# Altium PCB electronic_dc_load_v2.PcbDoc (part 4 of 4)
Units mm, origin at the board's own origin, x right, y up, seen from the top; angles counter-clockwise.
Board outline 170 x 170 mm, 4 copper layers (Top Layer, Int1(GND), Int2, Bottom Layer(PWR)), stack 1.607 mm thick; 177 components, 118 nets, 502 pads, 141 vias.
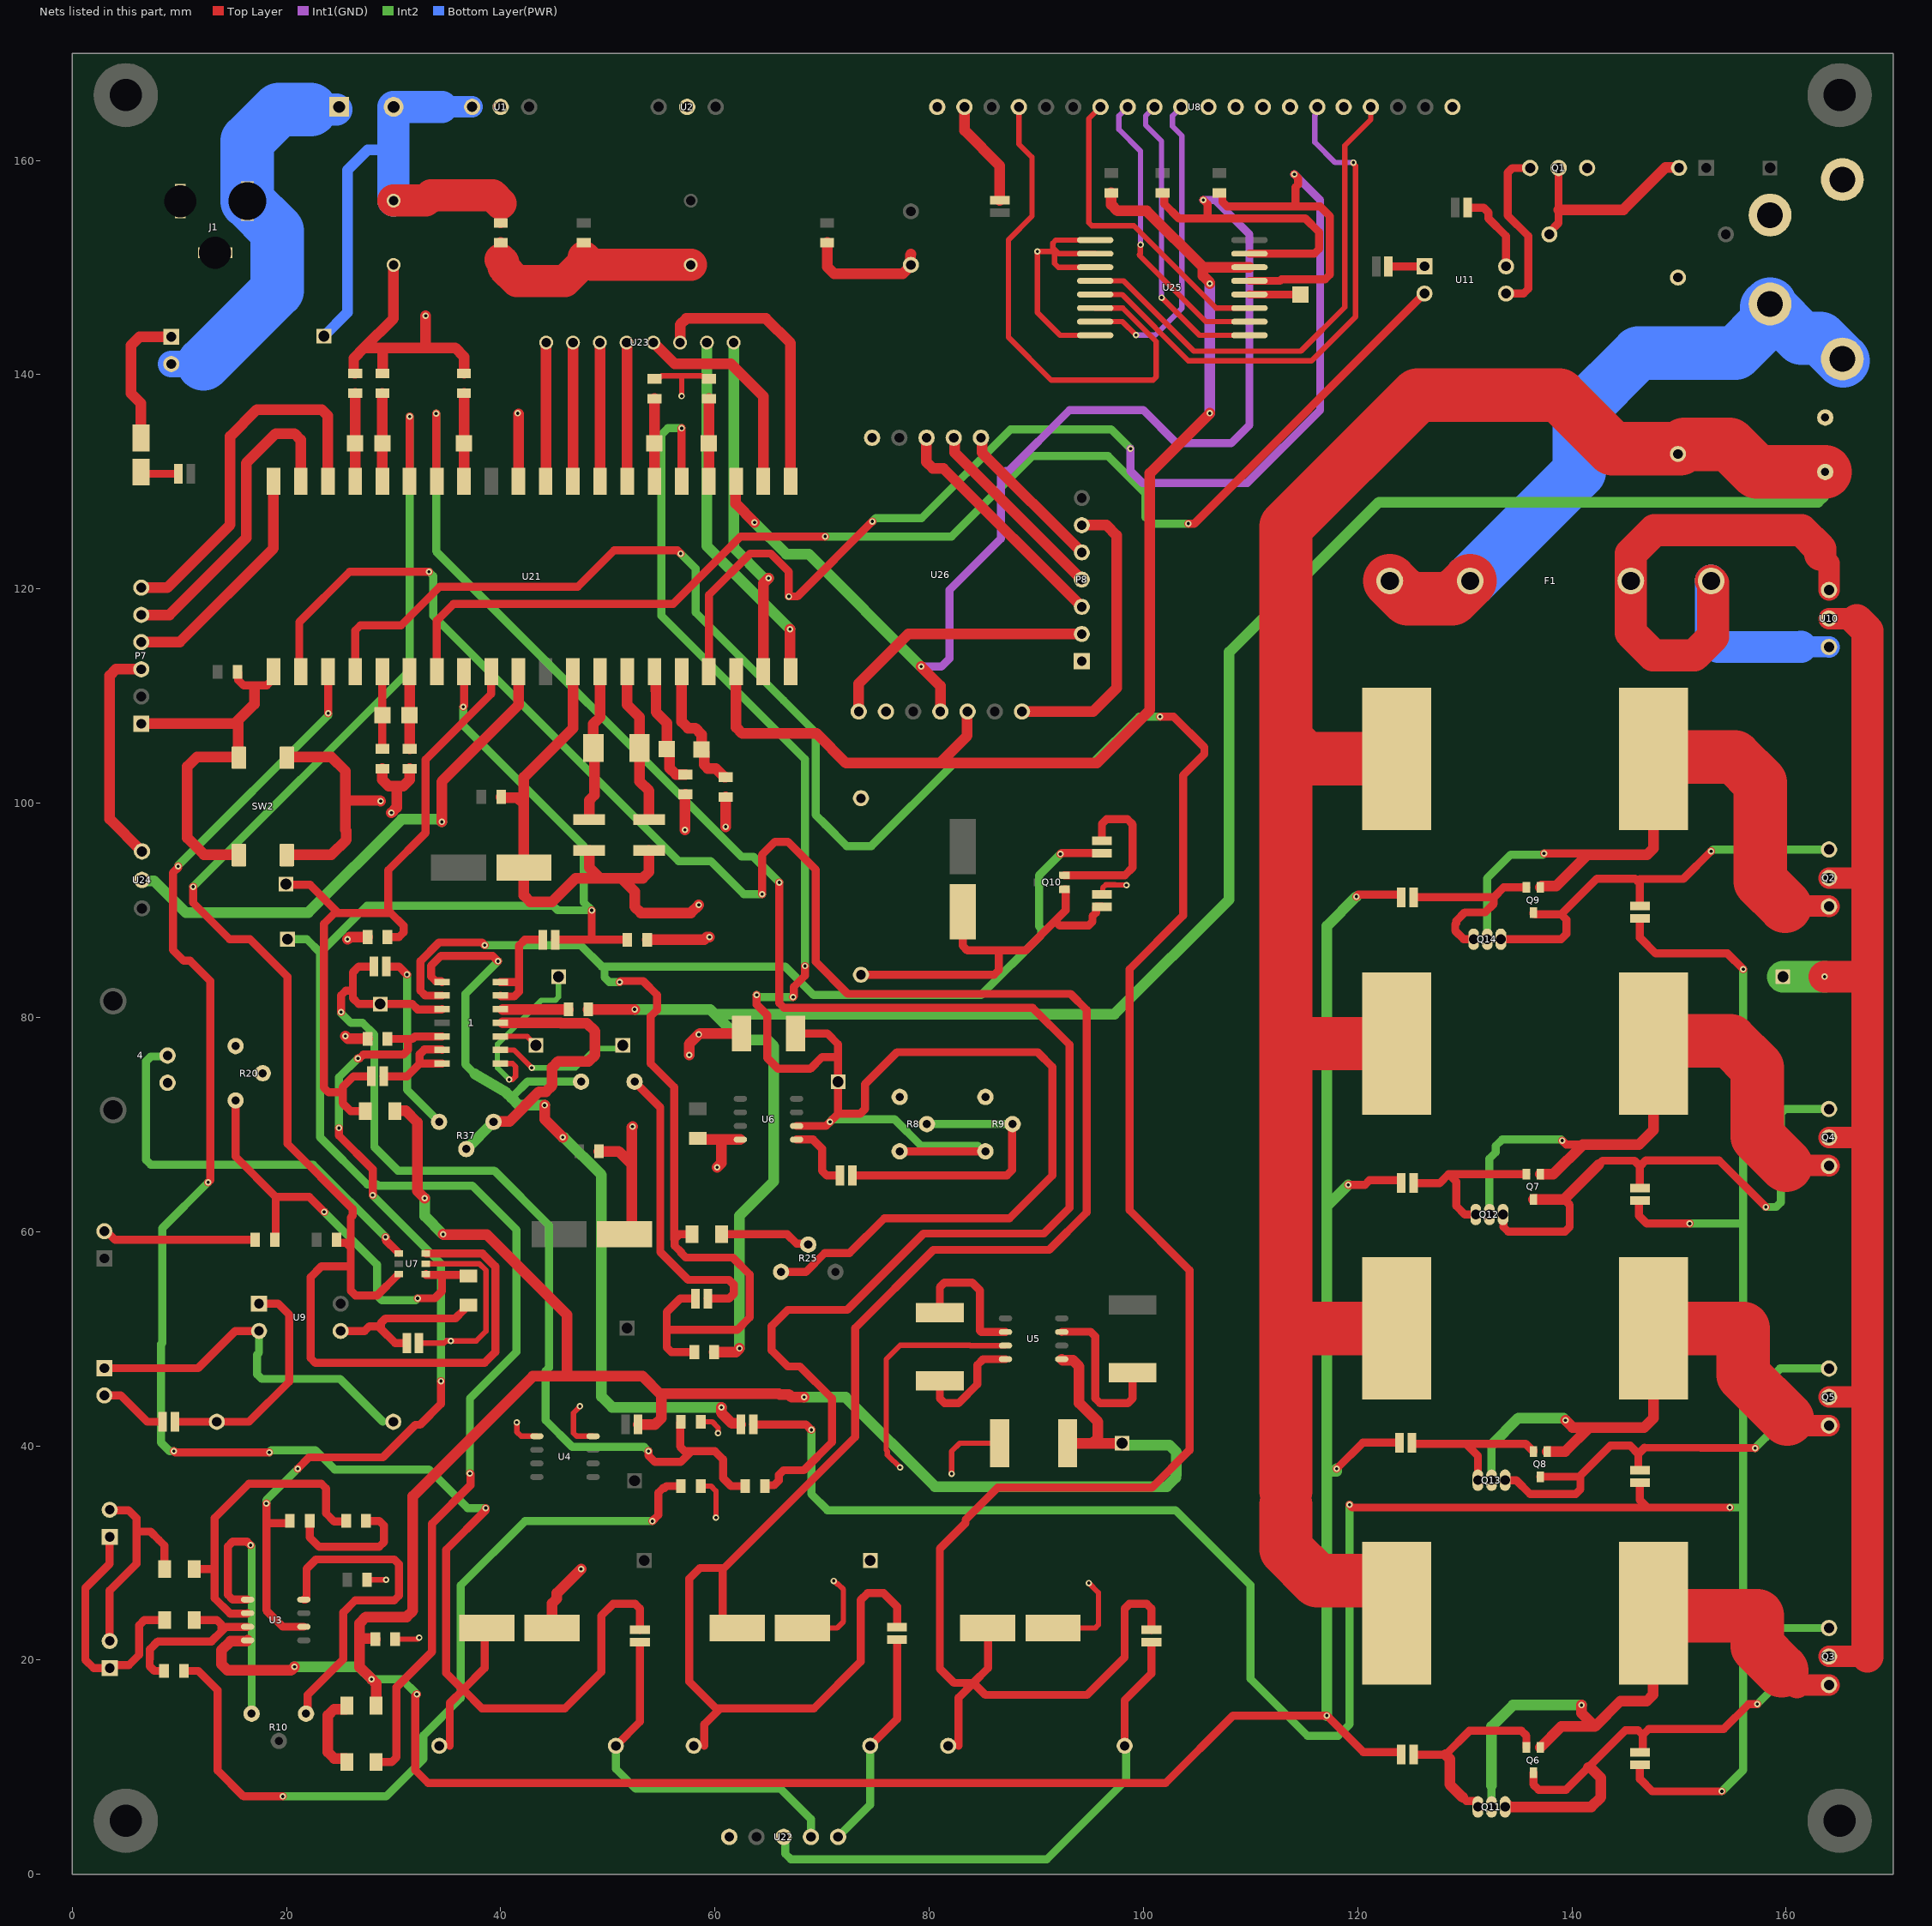
[diagram p4: the nets of this part, all layers, seen from the top]

## Via types
v1: diameter 0.6, hole 0.3, Top Layer to Bottom Layer(PWR), 141 vias

## Nets (pads, with @x,y where several pads share a name; then routed paths per layer and width w, separated by ;. In a path a pad name is that pad's centre, name@x,y a point inside that pad or via, vN(x,y) a via of type N, cw(c..) or ccw(c..) an arc to the next point about the centre after c; other vN are vias at no path point) (continued)
-5: C7.1 C14.2 J3.01 R4.2 R12.2 R43.1 R44.1 R45.1 R46.1 R49.2 U3.4 U5.5 | length 393.1
  Top Layer w0.75: v1(32.175,16.825) 32.025,16.675 32.025,9.725 33.225,8.525 102.075,8.525 108.375,14.825 v1(117.125,14.825) 120.524,11.426 R43.1@123.829,11.426 ; v1(118.05,37.875) 120.475,40.3 R45.1@123.925,40.3 ; v1(119.125,64.375) 120.675,64.375 121.1,64.8 123.812,64.8 R44.1@123.829,64.783 ; v1(119.875,91.275) 120.062,91.462 R46.1@123.829,91.462
  Top Layer w1: U3.4@16.375,21.845 16.305,21.775 14.775,21.775 13.925,20.925 13.925,19.636 14.511,19.05 20.425,19.05 v1(20.75,19.375) ; C7.1@28.3,21.95 28.25,22 26.825,22 ; R49.2@28.375,15.75 28.375,17.8 v1(27.95,18.225) 26.825,19.35 26.825,22 ; R4.2@30.125,71.25 30.175,71.3 31.125,71.3 32.225,70.2 32.225,63.8 v1(32.9,63.125) ; v1(34.625,59.75) 34.65,59.725 38.7,59.725 46.175,52.25 46.175,46.5 ; R12.2@52.825,42 54.414,42 55,42.586 55,44.75 ; v1(68.325,44.55) 67.15,44.55 66.9,44.8 66.05,44.8 65.975,44.875 55.125,44.875 55,44.75 ; U5.5@92.375,48.095 92.47,48 93.414,48 94,47.414 94,44 95.75,42.25 95.75,40.75 95.25,40.25 ; C14.2@92.925,40.25 95.25,40.25 ; J3.01@98,40.25 95.25,40.25 ; 26.825,22 26.825,23.439 27.411,24.025 31.214,24.025 31.8,24.611 31.8,35.3 43,46.5 46.175,46.5 ; 46.175,46.5 53.25,46.5 55,44.75
  Int2 w0.75: v1(27.95,18.225) 30.775,18.225 v1(32.175,16.825)
  Int2 w1: v1(20.75,19.375) 26.8,19.375 v1(27.95,18.225) ; v1(32.9,63.125) 32.925,63.1 32.925,61.45 v1(34.625,59.75) ; v1(68.325,44.55) 72.2,44.55 80.55,36.2 102.185,36.2 103.025,37.04 103.025,37.275 103.075,37.325 103.075,39.425 102.435,40.065 98.185,40.065 J3.01@98,40.25 ; v1(117.125,14.825) 117.125,37.625 ; v1(118.05,37.875) 118.05,37.625 117.125,37.625 ; v1(119.125,64.375) 117.125,62.375 ; v1(119.875,91.275) 117.125,88.525 117.125,62.375 ; 117.125,37.625 117.125,62.375
B1: Q3.3 Q6.1 Q11.2 R38.2 | length 62.2
  Top Layer w1: Q6.1@137.054,11.843 139.011,13.8 142.15,13.8 ; v1(140.9,15.8) 140.9,15.05 142.15,13.8 ; R38.2@149.277,26.05 R38.2@147.611,24.384 147.575,24.348 147.575,16.761 146.989,16.175 144.525,16.175 142.15,13.8
  Top Layer w2: 161.02,17.68 Q3.3@164,17.68
  Top Layer w2.5: 159.7,19 161.02,17.68
  Top Layer w5: R38.2@147.845,24.15 157.3,24.15 157.3,21.3 159.6,19
  Int2 w0.75: Q11.2@132.5,6.3 132.5,8.3
  Int2 w1: 132.5,8.3 132.5,13.8 134.5,15.8 v1(140.9,15.8)
B2: Q4.3 Q7.1 Q12.2 R39.2 | length 60.3
  Top Layer w0.75: v1(139.1,68.5) 139.475,68.125 141.025,68.125
  Top Layer w1: Q7.1@137.054,65.372 138.272,65.372 141.025,68.125 146.25,68.125 147.611,69.486 R39.2@147.611,77.555
  Top Layer w2: 160,66.2 163.93,66.2 Q4.3@164,66.13
  Top Layer w5: R39.2@147.856,77.8 154.8,77.8 157.3,75.3 157.3,68.9 160,66.2
  Int2 w0.75: Q12.2@132.3,61.6 132.3,66.8 132.9,67.4 132.9,68 133.5,68.6 139,68.6 v1(139.1,68.5)
B3: Q5.3 Q8.1 Q13.2 R40.2 | length 56.1
  Top Layer w1: Q8.1@137.704,39.475 139.375,39.475 141.625,41.725 ; v1(139.4,42.4) 140.075,41.725 141.625,41.725 ; R40.2@147.611,50.969 147.611,42.586 146.75,41.725 141.625,41.725 ; 160.1,42.5 160.695,41.905
  Top Layer w2: 160.695,41.905 Q5.3@164,41.905
  Top Layer w5: R40.2@147.611,50.969 155.969,50.969 155.969,46.631 160.1,42.5
  Int2 w0.75: Q13.2@132.5,36.799 132.5,40.1
  Int2 w1: 132.5,40.1 135,42.6 139.2,42.6 v1(139.4,42.4)
B4: Q2.3 Q9.1 Q14.2 R41.2 | length 63.9
  Top Layer w0.75: v1(137.4,95.3) 141.362,95.3 141.462,95.2
  Top Layer w1: Q9.1@137.054,92.137 137.175,92.258 138.521,92.258 141.462,95.2 147.025,95.2 147.611,95.786 R41.2@147.611,104.14
  Top Layer w2: 159.9,90.4 163.955,90.4 Q2.3@164,90.355
  Top Layer w5: R41.2@147.771,104.3 155.2,104.3 157.6,101.9 157.6,92.7 159.9,90.4
  Int2 w0.75: Q14.2@132.1,87.3 132.1,93 134.3,95.2 137.3,95.2 v1(137.4,95.3)
DB4: U8.11 U25.7 | length 29.2
  Top Layer w0.5: U25.7@95.5,144.95 98.05,144.95 v1(99.3,143.7)
  Int1(GND) w0.5: v1(99.3,143.7) 101.1,143.7 103.6,146.2 103.6,162.3 102.705,163.195 102.705,164.167 U8.11@103.533,164.995
DB5: U8.12 U25.9 | length 28.4
  Top Layer w0.5: v1(101.7,147.2) 105.22,143.68 U25.9@109.9,143.68
  Int1(GND) w0.5: U8.12@101.033,164.995 100.205,164.167 100.205,163.295 101.7,161.8 v1(101.7,147.2)
DB6: U8.13 U25.10 | length 27.9
  Top Layer w0.5: v1(99.731,152.131) 99.712,152.112 99.712,151.312 99.6,151.2 105.85,144.95 U25.10@109.9,144.95
  Int1(GND) w0.5: U8.13@98.533,164.995 97.705,164.167 97.705,162.895 99.731,160.869 v1(99.731,152.131)
DB7: U8.14 U25.11 | length 29.6
  Top Layer w0.5: U8.14@95.993,164.995 94.9,163.902 94.9,154.193 95.193,153.9 99.1,153.9 106.78,146.22 U25.11@109.9,146.22
E: U8.6 U25.5 | length 50.8
  Top Layer w0.5: U25.5@95.5,147.49 98.01,147.49 104.2,141.3 115.7,141.3 119.8,145.4 119.8,159.5 119.623,159.677 119.623,159.781 v1(119.604,159.8)
  Int1(GND) w0.5: U8.6@116.233,164.995 116.037,164.799 116.037,164.227 116,164.19 116,161.7 117.9,159.8 v1(119.604,159.8)
GND: 1.11 4.2 B3.1 B4.1 C1.2 C2.2 C3.2 C4.2 C5.2 C6.2 C7.2 C8.2 C9.2 C10.2 C11.2 C12.2 C13.2 C14.1 C17.2 C18.2 C19.2 C20.2 C21.1 C22.1 C23.2 C24.2 C26.2 D1.2 D7.K D8.A J1.2 J1.3 J13.01 P1.1 P7.3 P8.1 Q1.3 R7.1 R8.3 R9.3 R15.1 R19.1 R20.2 R20.3 R37.2 R37.3 R52.2 R53.2 R54.2 R55.2 R56.2 R57.2 R58.2 R59.2 R60.2 R61.1 R65.1 SW2.3 SW2.4 U1.2 U2.2 U4.1 U4.8 U5.3 U6.4 U7.2 U8.1 U8.5 U8.7 U8.8 U8.9 U8.10 U8.20 U21.12 U21.31 U22.5 U24.3 U25.1 U25.2 U25.3 U25.8 U26.2 U26.12 | length 383.2
  Top Layer w0.5: C11.2@27.525,27.5 v1(29.3,27.5) ; C7.2@30.15,21.95 32.25,21.95 v1(32.4,22.1) ; R19.1@32.375,49.6 34.7,49.6 34.9,49.8 v1(35.354,49.8) 37.721,49.8 38.621,50.7 38.621,56.386 38.007,57 U7.2@33.025,57 ; v1(41.5,42.2) 41.519,42.181 41.519,41.291 41.905,40.905 U4.1@43.375,40.905 ; v1(47.4,43.7) 47.4,43.673 46.8,43.073 46.8,41.198 47.093,40.905 U4.8@48.625,40.905 ; R55.2@54.356,139.609 54.556,139.809 54.958,139.809 55.049,139.9 56.9,139.9 ; v1(56.9,138) 56.9,139.9 ; R15.1@58.675,36.25 59.65,36.25 60.1,35.8 v1(60.1,33.3) ; C19.2@58.675,42.25 59.75,42.25 60.3,41.7 v1(60.3,41.2) ; R56.2@59.436,139.609 59.236,139.809 58.834,139.809 58.743,139.9 56.9,139.9 ; C20.2@68.18,23 71.4,23 72,23.6 72,26.6 71.5,27.1 71.427,27.1 71.127,27.4 v1(71.1,27.4) ; v1(77.28,37.98) 76.1,39.159 76.1,39.5 76,39.6 76,48.1 77.3,49.4 83.8,49.4 83.835,49.365 U5.3@87.125,49.365 ; v1(82.1,37.4) 82.1,39.5 82.85,40.25 C14.1@86.575,40.25 ; C24.2@91.56,23 95.5,23 95.8,23.3 95.8,26.3 v1(94.9,27.2) ; U25.8@95.5,143.68 92.22,143.68 90.1,145.8 v1(90.1,151.5) 91.537,151.5 91.7,151.663 ; U25.3@95.5,150.03 92.063,150.03 91.7,150.393 91.7,151.663 ; U25.2@95.5,151.3 92.1,151.3 91.9,151.5 91.719,151.681 ; U25.1@95.5,152.57 91.83,152.57 91.537,152.277 91.537,151.863 91.719,151.681 ; R65.1@96.13,91.485 96.2,91.555 96.2,92.088 96.493,92.381 97.344,92.381 97.363,92.362 98.39,92.362 v1(98.409,92.343) ; 91.7,151.663 91.719,151.681
  Top Layer w1: D1.2@6.425,134.1 6.425,137.325 5.5,138.25 5.5,142.75 6.29,143.54 P1.1@9.25,143.54 ; P7.3@6.451,112.5 4.086,112.5 3.5,111.914 3.5,98.513 U24.3@6.513,95.5 ; SW2.3@19.99,95.2 24.2,95.2 25.586,96.586 25.586,97.414 25.5,97.5 25.5,100.25 ; SW2.4@19.99,104.3 24.2,104.3 25.5,103 25.5,100.25 ; v1(25.5,78.25) 25.75,78 R7.1@27.575,78 ; v1(25.707,87.293) 25.914,87.5 C8.2@27.575,87.5 ; R54.2@26.416,140.117 26.331,140.117 26.281,140.167 26.281,141.531 27.25,142.5 ; v1(28.8,100.2) 28.75,100.25 25.5,100.25 ; R60.2@28.956,103.215 28.956,102.186 29.542,101.6 30.3,101.6 ; R53.2@29,140.161 29,142.5 ; v1(29.8,99.1) 30.3,99.6 30.3,101.6 ; C2.2@30,150.25 30,145.25 27.25,142.5 ; R59.2@31.496,103.215 31.5,103.211 31.5,102.186 30.914,101.6 30.3,101.6 ; v1(33,145.5) 33,142.5 ; R52.2@36.576,140.117 36.576,141.674 35.75,142.5 33,142.5 ; R37.3@39.33,70.25 39.369,70.289 40.816,70.289 43.581,73.054 44.214,73.054 44.8,73.64 44.8,75.314 45.386,75.9 48.214,75.9 48.8,76.486 48.8,78.7 48.027,79.473 45.615,79.473 45.592,79.496 1.11@40.2,79.496 ; 40,150.75 C3.2@40,152.325 ; C17.2@40.041,100.584 40.041,100.55 40.091,100.5 41.58,100.5 42.166,99.914 ; U21.31@41.656,130.048 v1@41.656,136.344 ; C23.2@44.8,23 44.8,25.3 45.25,25.75 45.25,26.25 v1(47.5,28.5) ; U21.12@46.736,112.268 46.736,106.986 42.166,102.416 42.166,99.914 ; C22.1@48.26,95.603 48.26,93.99 49.25,93 ; C9.2@49.175,67.5 51,67.5 52.25,66.25 ; C10.2@51.55,59.75 52.25,60.45 52.25,66.25 ; v1(52.3,69.8) 52.25,69.75 52.25,66.25 ; C26.2@53.675,87.25 59,87.25 59.25,87.5 v1(59.5,87.5) ; C21.1@53.848,95.603 53.848,93.586 53.262,93 51.25,93 ; v1(57.2,97.5) 57.2,100.775 R58.2@57.25,100.825 ; v1(57.6,76.5) 57.6,77.5 58.6,78.5 C13.2@62.475,78.5 ; v1(58.5,90.5) 57.75,89.75 53.086,89.75 52.5,90.336 52.5,91.75 51.25,93 ; C12.2@58.75,68.625 58.765,68.61 60.6,68.61 ; v1(60.2,66) 60.6,66.4 60.6,68.61 ; v1(61,97.8) R57.2@61,100.575 ; U6.4@62.375,68.595 62.36,68.61 60.6,68.61 ; C5.2@70.48,152.325 70.48,150.07 71.125,149.425 77.55,149.425 78.25,150.125 78.25,151.2 78.3,151.25 ; 27.25,142.5 29,142.5 ; 29,142.5 33,142.5 ; 42.166,99.914 C18.2@42.166,93.98 42.166,91.386 42.752,90.8 44.8,90.8 47,93 49.25,93 ; 49.25,93 51.25,93
  Top Layer w3: 40,150.75 40.25,150.5 40.25,150.007 41.507,148.75 45.993,148.75 47.75,150.507 47.75,151 48.5,150.25 C6.2@57.75,150.25
  Int1(GND) w0.5: 34.9,49.8 v1(35.354,49.8)
  Int2 w1: R37.2@36.79,67.71 R37.3@39.33,70.25
  other v1: 58.5,78.4 41.6,136.4
Net1_1: 1.1 C16.2 R28.1 | length 79.4
  Top Layer w0.75: 1.1@34.525,83.31 34.45,83.385 33.943,83.385 33.504,83.824 33.504,84.834 34.42,85.75 37,85.75 37.004,85.746 39.254,85.746 v1(39.75,85.25)
  Top Layer w1: v1(44.1,71.8) 44.1,70.5 v1(45.8,68.8) ; v1(60.6,43.6) 60.6,43.1 61.6,42.1 62.325,42.1 R28.1@62.425,42
  Int2 w0.75: 37.581,74.719 36.7,75.6 36.7,82.2 v1(39.75,85.25) ; 41.2,72.7 42.5,74 C16.2@47.5,74
  Int2 w1: 37.581,74.719 40.477,73.02 40.568,72.929 40.999,72.499 41.697,71.8 v1(44.1,71.8) ; v1(45.8,68.8) 45.9,68.8 49.4,65.3 49.4,44.6 50.4,43.6 v1(60.6,43.6)
Net1_2: 1.2 R23.1 R26.2 R27.1 R66.1 | length 143.1
  Top Layer w0.75: 1.2@34.525,82.04 32.96,82.04 32.5,82.5 32.5,85.25 34.25,87 38.25,87 v1(38.5,86.75) ; v1(51.1,83.3) 51.2,83.4 53.3,83.4 54.6,82.1 54.6,80.7 54,80.1 54,75.7 56.2,73.5 56.2,59.3 ; R26.2@57.875,59.75 56.689,59.75 56.25,59.311 56.25,59.25 56.25,58.689 56.835,58.104 56.835,58.024 57.274,57.585 61.665,57.585 63.25,56 63.25,52 62.095,50.845 55.5,50.845 ; R23.1@58.075,48.75 55.939,48.75 55.5,49.189 55.5,50.845 ; R27.1@58.175,53.75 56.75,53.75 55.5,52.5 55.5,50.845 ; v1(92.25,95.25) 92.335,95.335 R66.1@96.13,95.335
  Int2 w0.75: v1(38.5,86.75) 47.45,86.75 49.45,84.75 49.8,84.75 ; v1(51.1,83.3) 50.139,83.3 49.7,83.739 49.7,84.65 49.8,84.75 ; v1(92.25,95.25) 90.25,93.25 90.25,88.5 90.439,88.311 90.439,87.689 84.85,82.1 69.2,82.1 66.55,84.75 49.8,84.75
Net1_3: 1.3 C19.1 J5.01 R29.2 R35.2 | length 95
  Top Layer w0.75: v1(25.1,80.5) 25.1,82.061 25.539,82.5 26,82.5 ; R35.2@28.175,84.75 26.75,84.75 26.2,84.2 26.2,81.8 26.75,81.25 J5.01@28.75,81.25 31.75,81.25 32.25,80.75 34.505,80.75 1.3@34.525,80.77 ; v1(53.8,39.5) 53.8,39.1 54.4,38.5 56.8,38.5 57.8,39.5 ; C19.1@56.825,42.25 56.75,42.175 56.75,39.939 57.189,39.5 57.8,39.5 ; R29.2@62.825,36.25 61.5,36.25 60.75,37 60.75,38.75 60,39.5 57.8,39.5
  Int2 w0.75: v1(25.1,80.5) 25.1,80.4 26.011,79.489 27.111,79.489 28.2,78.4 28.2,67.9 30.4,65.7 39.4,65.7 44.5,60.6 44.5,47.3 44.2,47 44.2,42.4 46.7,39.9 53.4,39.9 v1(53.8,39.5)
Net1_5: 1.5 R1.1 R7.2 U3.6 | length 85
  Top Layer w0.75: v1(18.125,34.625) 18.125,32.775 ; R1.1@20.325,33 20.325,32.85 20.25,32.775 18.125,32.775 ; v1(21.05,37.875) 22.1,38.925 29,38.925 32.05,41.975 32.475,41.975 34.425,43.925 v1(34.425,46.05) ; U3.6@21.625,23.115 19.66,23.115 18.125,24.65 18.125,32.775 ; v1(24.904,69.675) 24.904,68.971 28.05,65.825 v1(28.05,63.4) ; v1(26.675,76.175) 26.825,76.175 27.175,76.525 30.911,76.525 31.35,76.964 31.35,78 ; R7.2@29.425,78 31.35,78 ; 1.5@34.525,78.23 31.99,78.23 31.76,78 31.35,78
  Int2 w0.75: v1(18.125,34.625) 18.125,34.95 v1(21.05,37.875) ; v1(24.904,69.675) 24.904,74.404 v1(26.675,76.175) ; v1(28.05,63.4) 34.425,57.025 v1(34.425,46.05)
Net1_6: 1.6 1.7 R6.2 | length 9.1
  Top Layer w0.75: R6.2@29.075,74.5 31.25,74.5 32.44,75.69 ; 1.7@34.525,75.69 32.44,75.69 ; 1.6@34.525,76.96 34.485,77 32.879,77 32.44,76.561 32.44,75.69
Net1_8: 1.8 J9.01 | length 16.4
  Top Layer w0.5: 1.8@39.975,75.69 41.107,75.69 41.4,75.397 41.4,74.5 41.1,74.2 v1(40.8,74.2)
  Int2 w0.5: v1(40.8,74.2) 39.7,75.3 39.7,77.5 43.8,81.6 45.107,81.6 45.4,81.893 J9.01@45.4,83.8
Net1_9: 1.9 J11.01 | length 13
  Top Layer w0.5: 1.9@39.975,76.96 41.24,76.96 v1(42.9,75.3)
  Int2 w0.5: v1(42.9,75.3) 47,75.3 48.8,77.1 51.1,77.1 J11.01@51.4,77.4
Net1_10: 1.10 J7.01 | length 3.7
  Top Layer w0.5: 1.10@39.975,78.23 42.47,78.23 J7.01@43.3,77.4
Net1_12: 1.12 R50.1 | length 6.1
  Top Layer w1: 1.12@40.2,80.75 R50.1@46.325,80.75
Net1_13: 1.13 1.14 R51.1 | length 10.5
  Top Layer w0.75: 1.13@39.975,82.04 40.05,81.965 40.641,81.965 40.649,81.957 41.27,81.957 41.709,82.397 41.709,83.101 ; 1.14@39.975,83.31 41.5,83.31 41.709,83.101 ; R51.1@43.925,87.25 42.25,87.25 41.709,86.709 41.709,83.101
Net4_1: 4.1 U7.4 | length 38.7
  Top Layer w0.75: v1(29.25,59.5) 29.25,59.229 30.375,58.104 30.375,58.1 U7.4@30.45,58.025
  Int2 w0.75: 4.1@8.9,76.44 8.815,76.355 7.339,76.355 6.9,75.915 6.9,66.689 7.339,66.25 22.5,66.25 v1(29.25,59.5)
NetB1_1: B1.1 B2.1 F1.3 F1.4 | length 60.4
  Top Layer w5: F1.3@123,120.75 124.679,119.071 128.821,119.071 F1.4@130.5,120.75
  Bottom Layer(PWR) w5: F1.4@130.5,120.75 140.7,130.95 140.7,136.5 146.2,142 155.271,142 158.2,144.929 B1.1@158.2,146.3 ; B1.1@158.5,146.6 158.5,146.329 161.429,143.4 163.2,143.4 B2.1@165.3,141.3
NetC2_1: C2.1 C3.1 J10.01 SW1.2 U1.1 | length 49.9
  Top Layer w1: C3.1@40,154.175 40,156
  Top Layer w3: C2.1@30,156.25 33,156.25 33.5,156.75 39.25,156.75 40,156
  Bottom Layer(PWR) w1: J10.01@23.5,143.6 25.7,145.8 25.7,159.1 27.6,161 30,161
  Bottom Layer(PWR) w2: 34.5,165 U1.1@37.34,165
  Bottom Layer(PWR) w3: C2.1@30,156.25 30,161 SW1.2@30,165 34.5,165
NetC8_1: C8.1 J12.01 R4.1 R6.1 U21.9 | length 67.9
  Top Layer w0.75: J12.01@20.333,92.434 20.271,92.434 J12.01@19.961,92.442 20.011,92.392 22.208,92.392 24.85,89.75 ; R4.1@27.375,71.25 26,71.25 25.25,72 25.25,73 ; R6.1@27.925,74.5 26.25,74.5 25.25,73.5 25.25,73 ; C8.1@29.425,87.5 30.5,87.5 30.939,87.939 30.939,88.561 29.75,89.75 ; U21.9@39.116,112.268 39.116,110.196 33,104.08 33,97.25 29.5,93.75 29.5,90 29.75,89.75 ; 25.25,73 23.939,73 23.5,73.439 23.5,88.75 24.5,89.75 29.75,89.75
NetC13_1: C13.1 J2.01 R8.1 R9.1 R25.3 U6.6 U21.25 | length 185.4
  Top Layer w0.75: U21.25@56.896,130.048 56.896,134.996 v1(56.9,135) ; v1(63.9,82.1) 63.9,81.2 64.9,80.2 64.9,76.2 65.9,75.2 68.9,75.2 70,76.3 71.5,76.3 ; R25.3@66.17,56.25 68.5,56.25 70.25,58 72.561,58 75.811,61.25 87.5,61.25 91.5,65.25 91.5,75.379 90.129,76.75 77,76.75 74,73.75 74,71.439 73.561,71 71.5,71 ; v1(67.3,81.904) 67.361,81.965 67.361,82.861 68.4,83.9 v1(68.4,84.8) ; C13.1@67.525,78.5 70.5,78.5 71.5,77.5 71.5,76.3 ; U6.6@67.625,69.865 70.365,69.865 v1(70.75,70.25) 71.5,71 ; R8.1@77.25,67.5 R9.1@85.25,67.5 ; 71.5,71 J2.01@71.5,74 71.5,76.3
  Int2 w0.75: v1(56.9,135) 55.6,135 55,134.4 55,117.5 68.4,104.1 v1(68.4,84.8) ; v1(63.9,82.1) 64.096,81.904 v1(67.3,81.904) ; v1(70.75,70.25) 71,70.5 76.75,70.5 79.25,68 84.541,68 85.041,67.5 R9.1@85.25,67.5
NetC15_1: C15.1 R17.1 R20.1 U7.1 | length 41.8
  Top Layer w0.75: R20.1@15.25,72.25 15.25,67 19,63.25 ; R17.1@18.925,59.25 19,59.325 19,63.25 ; v1(23.525,61.85) 22.125,63.25 19,63.25 ; v1(32.25,53.775) 33.85,53.775 34.525,54.45 34.525,55.9 34.45,55.975 ; U7.1@33.025,56.05 33.025,56 33.05,55.975 34.45,55.975 ; C15.1@37,55.875 36.9,55.975 34.45,55.975
  Int2 w0.75: v1(23.525,61.85) 28.45,56.925 28.45,54.039 28.889,53.6 32.075,53.6 v1(32.25,53.775)
NetC15_2: C15.2 R19.2 U9.3 | length 16.5
  Top Layer w0.75: U9.3@25.06,50.73 27.311,50.73 27.75,51.169 28.581,51.169 28.811,50.939 ; R19.2@31.225,49.6 31.214,49.611 30.139,49.611 28.811,50.939 ; C15.2@37,53.125 36.775,53.125 36.55,52.9 36.55,52.675 35.775,51.9 29.25,51.9 28.811,51.461 28.811,50.939
NetC16_1: C16.1 R27.2 | length 28.5
  Top Layer w0.75: C16.1@52.5,74 54.9,71.6 54.9,58.1 57.5,55.5 61.311,55.5 61.75,55.061 61.75,54.189 61.311,53.75 R27.2@59.325,53.75
NetC20_1: C20.1 D4.K R34.2 U21.2 | length 236.6
  Top Layer w0.75: U21.2@21.336,112.268 21.2,112.404 21.2,116.9 25.9,121.6 v1(33.3,121.6) ; 59,12 59,14 60.3,15.3 60.5,15.5 ; C20.1@60.73,23 60.73,28.469 ; v1(64.4,91.5) 64.4,95.2 65.6,96.4 66.8,96.4 69.404,93.796 69.404,85.196 72.4,82.2 93.2,82.2 94.7,80.7 94.7,61.8 91.2,58.3 80.4,58.3 73.1,51 73.1,40.839 60.73,28.469 ; R34.2@77,23.075 77,25 75.75,26.25 74.25,26.25 73.6,25.6 73.6,19.85 69.25,15.5 60.5,15.5 ; 60.5,15.5 60.1,15.5 57.6,18 57.6,27.6 58.6,28.6 60.599,28.6 60.73,28.469
  Int2 w0.75: v1(33.3,121.6) 33.7,121.2 33.7,117.5 56.6,94.6 59.6,94.6 62.7,91.5 v1(64.4,91.5)
NetC21_2: C21.2 U21.14 Y1.2 | length 14.7
  Top Layer w1: U21.14@51.816,112.268 51.816,109.184 52.95,108.05 Y1.2@52.95,105.156 52.95,102.05 53.848,101.152 C21.2@53.848,98.453
NetC22_2: C22.2 U21.13 Y1.1 | length 14.3
  Top Layer w1: C22.2@48.26,98.453 48.26,100.26 48.75,100.75 48.75,105.056 Y1.1@48.65,105.156 48.65,107.4 49.276,108.026 U21.13@49.276,112.268
NetC23_1: C23.1 D5.K R42.2 U21.3 | length 172.8
  Top Layer w0.75: v1(9.5,39.5) 9.6,39.4 v1(18.4,39.4) ; v1(9.9,94.1) 9.9,94 9.4,93.5 9.4,86.3 10.4,85.3 11,85.3 12.9,83.4 12.9,64.8 v1(12.7,64.6) ; U21.3@23.876,112.268 23.9,112.244 v1(23.9,108.4) ; 35.25,12 35.25,16 36.5,17.25 ; v1(38.6,34.2) 38.6,34 34.9,30.3 34.9,18.8 36.45,17.25 36.5,17.25 ; C23.1@38.7,23 38.5,22.8 38.5,19.25 36.5,17.25 ; R42.2@53,22.825 53,24.811 52.561,25.25 50.5,25.25 49.4,24.15 49.4,18.9 46,15.5 38.25,15.5 36.5,17.25
  Int2 w0.75: v1(9.5,39.5) 9.1,39.5 8.3,40.3 8.3,49.5 8.4,49.6 8.4,60.3 v1(12.7,64.6) ; v1(9.9,94.1) 9.9,94.2 23.9,108.2 v1(23.9,108.4) ; v1(18.4,39.4) 18.6,39.6 22.7,39.6 24.5,37.8 33.3,37.8 36.9,34.2 v1(38.6,34.2)
NetC24_1: C24.1 D6.K R47.2 U21.4 | length 261.4
  Top Layer w0.75: U21.4@26.416,112.268 26.416,116.116 26.9,116.6 30.7,116.6 34.3,120.2 47.2,120.2 50.6,123.6 56.5,123.6 v1(56.8,123.3) ; 82.75,12 82.75,16.5 84.125,17.875 ; C24.1@85.46,23 85.5,22.96 85.5,19.25 84.125,17.875 ; R47.2@100.75,22.825 100.75,24.811 100.311,25.25 98.689,25.25 98.25,24.811 98.25,20.25 94.75,16.75 85.25,16.75 84.125,17.875 ; v1(101.546,108.084) 102.816,108.084 105.689,105.211 105.689,104.589 103.7,102.6 103.7,89.5 98.7,84.5 98.7,62 104.3,56.4 104.3,39.6 100.8,36.1 86.4,36.1 83.4,33.1 83.4,32.8 81,30.4 81,19.2 82.325,17.875 84.125,17.875
  Int2 w0.75: v1(56.8,123.3) 58.2,121.9 58.2,117.8 66.4,109.6 69.404,106.596 69.404,98.896 70.3,98 72.3,96 74.6,96 82.3,103.7 95.2,103.7 99.584,108.084 v1(101.546,108.084)
NetC25_2: C25.2 D8.K Q10.1 R65.2 | length 37.7
  Top Layer w0.75: D8.K@73.326,83.985 86.061,83.985 86.5,84.424 86.5,86.25 ; C25.2@83.13,89.86 83.13,86.689 83.569,86.25 86.5,86.25 ; Q10.1@92.63,91.96 92.725,91.96 92.75,91.935 92.75,90 91.75,89 ; R65.2@96.13,90.335 95.605,90.335 95.58,90.31 95.58,89.785 95.25,89.455 95.25,88.939 94.885,88.575 92.175,88.575 91.75,89 ; 86.5,86.25 89,86.25 91.75,89
NetC26_1: C26.1 J15.01 R48.1 R51.2 U21.8 | length 162.8
  Top Layer w0.75: R48.1@28.375,10.5 29.836,10.5 30.275,10.939 30.275,17.475 33.6,20.8 33.6,32.75 37.175,36.325 37.175,37.375 v1(37.125,37.425) ; v1(36.5,109) 36.576,109.076 U21.8@36.576,112.268 ; R51.2@45.075,87.25 48.5,87.25 ; v1(48.5,90) 48.5,87.25 ; C26.1@51.825,87.25 48.5,87.25
  Int2 w0.75: J15.01@20.1,87.3 21.9,87.3 23.15,86.05 ; v1(36.5,109) 36.5,107.25 47.75,96 47.75,90.75 v1(48.5,90) 45.325,90 44.9,90.425 27.525,90.425 23.15,86.05 ; v1(37.125,37.425) 37.125,44.425 41.475,48.775 41.475,60.175 37.35,64.3 28.57,64.3 28.466,64.404 27.546,64.404 23.15,68.8 23.15,86.05
NetC27_2: C27.2 U5.7 | length 15.4
  Top Layer w0.75: U5.7@92.375,50.635 92.402,50.662 95.061,50.662 95.5,50.222 95.5,44.439 95.939,44 98.561,44 99,44.439 C27.2@99,46.825
NetC28_1: C28.1 U5.2 | length 12.8
  Top Layer w0.75: C28.1@81,52.425 81,54.811 81.439,55.25 84,55.25 84.75,54.5 84.75,50.75 84.865,50.635 U5.2@87.125,50.635
NetC28_2: C28.2 U5.4 | length 10.7
  Top Layer w0.75: C28.2@81,46.075 81,44.439 81.439,44 82.75,44 84.5,45.75 84.5,47.561 85.034,48.095 U5.4@87.125,48.095
NetD1_1: D1.1 R11.1 | length 3.6
  Top Layer w0.75: D1.1@6.425,130.9 6.575,130.75 R11.1@9.925,130.75
NetD2_A: D2.A R18.2 U9.1 | length 21.7
  Top Layer w0.75: R18.2@9.575,42.25 D2.A@13.5,42.25 16.5,42.25 20.25,46 20.25,52.25 19.23,53.27 U9.1@17.44,53.27
NetD2_K: D2.K P5.1 U9.2 | length 33.6
  Top Layer w0.75: P5.1@3,47.25 11.75,47.25 15.23,50.73 U9.2@17.44,50.73
  Int2 w0.75: U9.2@17.44,50.73 17.44,48.703 17.25,48.513 17.25,46.689 17.689,46.25 25,46.25 29,42.25
NetD3_A: D3.A P6.2 Q1.2 | length 19.5
  Top Layer w0.75: D3.A@137.9,153.1 137.9,153.303 138.76,154.163 138.76,155.4 Q1.2@138.76,159.3
  Top Layer w1: 138.76,155.4 144.8,155.4 148.759,159.359 149.941,159.359 P6.2@150,159.3
NetD4_A: D4.A R34.1 U22.1 | length 20.7
  Top Layer w0.75: D4.A@74.5,12 77,14.5 R34.1@77,21.925
  Int2 w0.75: U22.1@71.5,3.5 74.5,6.5 D4.A@74.5,12
NetD5_A: D5.A R42.1 U22.2 | length 34.6
  Top Layer w0.75: D5.A@50.75,12 53,14.25 R42.1@53,21.675
  Int2 w0.75: D5.A@50.75,12 50.75,9.85 52.6,8 66.125,8 68.96,5.165 U22.2@68.96,3.5
NetD6_A: D6.A R47.1 U22.3 | length 50.7
  Top Layer w0.75: D6.A@98.25,12 98.25,16.25 100.75,18.75 R47.1@100.75,21.675
  Int2 w0.75: U22.3@66.42,3.5 66.568,3.352 66.568,1.932 67.1,1.4 90.975,1.4 98.389,8.814 98.389,11.861 D6.A@98.25,12
NetD7_A: D7.A R23.2 R38.1 R39.1 R40.1 R41.1 R50.2 R61.2 | length 388.7
  Top Layer w1: R50.2@48.175,80.75 v1(52.5,80.75) ; R23.2@59.925,48.75 61.95,48.75 v1(62.3,49.1)
  Top Layer w5: 113.3,34.5 113.3,30.362 116.229,27.434 122.936,27.434 123.661,26.709 R38.1@123.661,24.384 ; 113.3,35.8 113.3,50.969 113.3,77.555 113.3,104.14 113.3,105.975 ; 113.504,50.969 R40.1@123.661,50.969 ; 113.504,77.555 R39.1@123.661,77.555 ; R41.1@123.661,104.14 115.135,104.14 113.3,105.975 ; R61.2@163.65,130.92 157.28,130.92 154.7,133.5 150.5,133.5 150.1,133.1 143.8,133.1 138.8,138.1 125.6,138.1 113.3,125.8 113.3,105.975
  Int2 w1: v1(52.5,80.75) 59.55,80.75 60,80.3 ; v1(62.3,49.1) 62.3,61.5 65.5,64.7 65.5,77.314 64.914,77.9 62.4,77.9 60,80.3 ; R61.2@163.65,130.92 163.558,130.828 163.558,128.686 162.972,128.1 122,128.1 108,114.1 108,91 97.3,80.3 60,80.3
NetF1_1: F1.1 F1.2 U10.1 U10.3 | length 62.3
  Top Layer w2: 163.177,123.223 164,122.4 U10.1@164,119.9
  Top Layer w3: F1.1@153,120.75 153.2,120.55 153.2,115.557 151.443,113.8 147.6,113.8 145.5,115.9 145.5,123.293 147.707,125.5 161.42,125.5 163.177,123.743 163.177,123.223
  Bottom Layer(PWR) w2: 161.4,114.6 163.98,114.6 U10.3@164,114.58
  Bottom Layer(PWR) w3: F1.1@153,120.75 153,115.257 153.677,114.58 161.4,114.6
NetJ1_1: J1.1 P1.2 SW1.1 | length 39.4
  Bottom Layer(PWR) w1: 13.25,141 14,141.75
  Bottom Layer(PWR) w2.5: P1.2@9.25,141 13.25,141
  Bottom Layer(PWR) w3: 22.25,164.75 SW1.1@24.67,164.75
  Bottom Layer(PWR) w5: 12.25,141 19.129,147.879 19.129,153.421 J1.1@16.35,156.2 16.35,161.821 19.279,164.75 22.25,164.75
NetJ14_01: J14.01 Q2.2 Q3.2 Q4.2 Q5.2 U10.2 | length 122.7
  Top Layer w2: Q3.2@164,20.34 167.6,20.34 ; Q5.2@164,44.565 167.8,44.565 ; Q4.2@164,68.79 167.8,68.79 ; Q2.2@164,93.015 167.8,93.015 ; U10.2@164,117.24 166.46,117.24 166.6,117.1
  Top Layer w3: v1(163.6,83.8) 167.6,83.8 ; 166.6,117.1 167.6,116.1 167.6,83.8 ; 167.6,20.34 167.6,44.565 167.6,68.79 167.6,83.8
  Int2 w3: J14.01@159.7,83.8 v1(163.6,83.8)
NetP2_1: P2.1 P3.1 R3.2 | length 23.6
  Top Layer w0.75: P3.1@3.5,31.5 3.5,29 1.229,26.729 1.229,20.021 2,19.25 P2.1@3.5,19.25 3.796,19.545 5.295,19.545 6.25,20.5 6.25,23.25 6.75,23.75 R3.2@8.625,23.75
NetP2_2: P2.2 P3.2 R5.2 | length 20.7
  Top Layer w0.75: P2.2@3.5,21.79 3.5,26.5 6,29 6,32 ; P3.2@3.5,34.04 3.54,34 5.25,34 6,33.25 6,32 ; R5.2@8.614,28.511 8.614,30.696 8.086,31.224 7.311,32 6,32
NetP4_2: P4.2 R17.2 | length 14.4
  Top Layer w0.75: P4.2@3,60.04 3.203,60.04 3.993,59.25 R17.2@17.075,59.25
NetP5_2: P5.2 R18.1 | length 6.4
  Top Layer w0.75: P5.2@3,44.71 4.54,44.71 7,42.25 R18.1@8.425,42.25
NetP7_1: P7.1 R36.1 SW2.1 SW2.2 U21.1 | length 38.7
  Top Layer w0.75: R36.1@15.425,112.25 15.5,112.175 15.5,111.5 16,111 18.163,111 18.796,111.633 U21.1@18.796,112.268
  Top Layer w1: P7.1@6.451,107.42 15.17,107.42 15.51,107.76 ; SW2.1@15.51,95.2 12.3,95.2 10.75,96.75 10.75,103.414 11.636,104.3 15.51,104.3 15.51,107.76 ; 17,110.784 17,109.25 15.51,107.76
NetP7_4: P7.4 U21.40 | length 22.2
  Top Layer w1: P7.4@6.451,115.04 10.04,115.04 18.796,123.796 U21.40@18.796,130.048
NetP7_5: P7.5 U21.39 | length 30.1
  Top Layer w1: P7.5@6.451,117.58 9.08,117.58 16.25,124.75 16.25,131.75 19,134.5 20.75,134.5 21.336,133.914 U21.39@21.336,130.048
NetP7_6: P7.6 U21.38 | length 35.5
  Top Layer w1: P7.6@6.451,120.12 8.87,120.12 14.75,126 14.75,134.25 17.25,136.75 23.29,136.75 23.876,136.164 U21.38@23.876,130.048
NetP8_2: P8.2 U26.1 | length 25.4
  Top Layer w1: U26.1@73.426,108.56 73.426,111.176 78.04,115.79 P8.2@94.25,115.79
NetP8_3: P8.3 U26.10 | length 22.4
  Top Layer w1: U26.10@79.756,134.112 79.756,131.836 80.342,131.25 81.33,131.25 P8.3@94.25,118.33
NetP8_4: P8.4 U26.9 | length 18.2
  Top Layer w1: U26.9@82.296,134.112 82.396,134.012 82.396,132.724 P8.4@94.25,120.87
NetP8_5: P8.5 U26.8 | length 14.6
  Top Layer w1: U26.8@84.836,134.112 84.936,134.012 84.936,132.724 P8.5@94.25,123.41
NetP8_6: P8.6 U26.7 | length 27.6
  Top Layer w1: U26.7@88.666,108.56 95.31,108.56 97.5,110.75 97.5,125 96.55,125.95 P8.6@94.25,125.95
NetQ1_1: Q1.1 U11.3 | length 16.2
  Top Layer w0.75: U11.3@133.858,147.574 135.486,147.574 135.925,148.013 135.925,152.95 134,154.875 134,158.853 134.439,159.292 136.092,159.292 Q1.1@136.1,159.3
NetQ2_1: Q2.1 Q9.3 Q14.3 R31.1 | length 41
  Top Layer w0.75: Q14.3@133.37,87.3 139,87.3 139.5,87.8 139.5,89.125 139,89.625 ; Q9.3@136.404,89.787 136.404,89.687 136.429,89.662 136.529,89.662 136.566,89.625 139,89.625 ; 146.143,92.718 145.911,92.95 142.325,92.95 139,89.625 ; R31.1@146.35,90.4 146.35,92.925 150.402,92.925 152.977,95.5 v1(153,95.5)
  Int2 w0.75: v1(153,95.5) 153.175,95.675 Q2.1@164,95.675
NetQ3_1: Q3.1 Q6.3 Q11.3 R32.1 | length 53
  Top Layer w0.75: Q6.3@136.404,9.493 136.404,8.396 136.9,7.9 139.45,7.9 141.525,9.975 145,13.45 146.186,13.45 146.625,13.011 ; R32.1@146.35,11.4 146.6,11.4 146.625,11.425 146.625,13.011 ; v1(157.3,15.9) 156.5,15.9 154.175,13.575 147.189,13.575 146.625,13.011
  Top Layer w1: Q11.3@133.78,6.4 134.1,6.4 134.2,6.3 141.8,6.3 142.7,7.2 142.7,9 141.725,9.975 141.525,9.975
  Int2 w0.75: v1(157.3,15.9) 158.5,17.1 158.5,22 159.5,23 Q3.1@164,23
NetQ4_1: Q4.1 Q7.3 Q12.3 R33.1 | length 52.5
  Top Layer w0.75: Q12.3@133.57,61.6 133.618,61.552 133.618,60.439 134.057,60 139.361,60 139.8,60.439 139.8,62.495 139.272,63.022 ; 142.5,66.25 142.875,66.625 145.836,66.625 146.35,66.111 ; R33.1@146.35,64.067 146.35,66.111 ; v1(158.1,62.3) 153.75,66.65 146.889,66.65 146.35,66.111
  Top Layer w1: Q7.3@136.404,63.022 139.272,63.022 142.5,66.25
  Int2 w0.75: v1(158.1,62.3) 159.061,62.3 159.5,62.739 159.5,71.011 159.939,71.45 Q4.1@164,71.45
NetQ5_1: Q5.1 Q8.3 Q13.3 R30.1 | length 45.4
  Top Layer w0.75: Q13.3@133.77,36.799 133.771,36.8 134.8,36.8 136.1,35.5 140.361,35.5 140.8,35.939 140.8,37.025 140.7,37.125 ; Q8.3@137.054,37.125 140.7,37.125 ; R30.1@146.35,37.733 146.227,37.733 146.202,37.758 146.202,39.258 ; v1(157.1,39.8) 146.794,39.85 146.202,39.258 ; 140.7,37.125 143.6,40.025 145.436,40.025 146.202,39.258
  Int2 w0.75: v1(157.1,39.8) 159,41.7 159,46.786 159.439,47.225 Q5.1@164,47.225
NetQ6_2: Q6.2 Q11.1 R43.2 | length 19.4
  Top Layer w0.75: R43.2@125.229,11.176 128.201,11.176 130.425,13.4 135.3,13.4 135.754,12.946 Q6.2@135.754,11.843 ; 129.8,7.2 130.152,6.848 131.115,6.848 131.23,6.732 Q11.1@131.23,6.3
  Top Layer w1: 128.201,11.176 128.6,10.777 128.6,8.4 129.8,7.2
NetQ7_2: Q7.2 Q12.1 R44.2 | length 16.3
  Top Layer w0.75: R44.2@125.229,64.533 127.658,64.533 128.497,65.372 ; Q12.1@131.03,61.6 130,61.6 129.2,62.4 129.2,64.67 128.497,65.372 ; Q7.2@135.754,65.372 128.497,65.372
NetQ8_2: Q8.2 Q13.1 R45.2 | length 15.5
  Top Layer w0.75: R45.2@125.1,40.2 130.1,40.2 ; Q13.1@131.23,36.799 131.23,39.07 130.1,40.2 ; Q8.2@136.404,39.475 136.404,39.575 136.379,39.6 136.279,39.6 135.679,40.2 130.1,40.2
NetQ9_2: Q9.2 Q14.1 R46.2 | length 18.7
  Top Layer w0.75: R46.2@125.229,91.212 132.712,91.212 ; Q14.1@130.83,87.3 129.9,87.3 129.111,88.089 129.111,88.711 129.2,88.8 129.2,89 130,89.8 131.9,89.8 132.712,90.612 132.712,91.212 ; Q9.2@135.754,92.137 133.637,92.137 132.712,91.212
NetQ10_2: Q10.2 R66.2 | length 15.5
  Top Layer w0.75: Q10.2@92.63,93.26 98.26,93.26 99,94 99,98 98.5,98.5 96.569,98.5 96.13,98.061 R66.2@96.13,96.485
NetR1_2: R1.2 R2.1 | length 12.4
  Top Layer w0.75: R1.2@22.175,33 22.175,31.45 23.05,30.575 28.661,30.575 29.1,31.014 29.1,32.561 28.661,33 R2.1@27.425,33
NetR2_2: R2.2 R5.1 U3.2 | length 29.6
  Top Layer w0.75: R5.1@11.375,28.5 13.15,28.5 13.3,28.35 ; U3.2@16.375,24.385 16.34,24.35 14.725,24.35 13.3,25.775 13.3,28.35 ; R2.2@25.575,33 25.525,32.95 24.45,32.95 23.7,33.7 23.7,36.036 23.261,36.475 16.5,36.475 13.3,33.275 13.3,28.35
NetR3_1: R3.1 R13.2 U3.3 | length 16.5
  Top Layer w0.75: R13.2@8.575,19 7.67,19 7.231,19.439 7.231,20.061 7.254,20.084 7.254,21.004 8,21.75 13,21.75 13.939,22.689 ; R3.1@11.375,23.75 13.5,23.75 13.939,23.311 13.939,22.689 ; U3.3@16.375,23.115 16.36,23.1 14.35,23.1 13.939,22.689
NetR8_2: R8.2 R9.2 R14.2 | length 27.7
  Top Layer w0.75: R14.2@72.825,65.25 87.25,65.25 87.75,65.75 87.75,70 R9.2@87.79,70.04
  Int2 w0.75: R8.2@79.565,70.04 R8.2@79.79,70.04 R9.2@87.79,70.04
NetR10_1: R10.1 U3.1 | length 24.8
  Top Layer w0.75: U3.1@16.375,25.655 14.964,25.655 14.525,26.094 14.525,30.611 14.964,31.05 16.325,31.05 v1(16.65,30.725)
  Int2 w0.75: v1(16.65,30.725) 16.75,30.625 R10.1@16.75,15
NetR10_3: R10.3 U3.8 | length 31.9
  Top Layer w0.75: U3.8@21.625,25.655 21.775,25.655 21.875,25.755 21.875,28.525 22.75,29.4 30.061,29.4 30.5,28.961 30.5,26.014 30.061,25.575 26.425,25.575 25.3,24.45 25.3,20.075 21.978,16.753 21.978,15.148 R10.3@21.83,15
NetR13_1: R13.1 R15.2 | length 76.3
  Top Layer w0.75: R13.1@10.425,19 11.775,19 13.575,17.2 13.575,9.7 16,7.275 v1(19.65,7.275) ; v1(54.15,32.975) 54.725,33.55 54.725,35.636 55.164,36.075 55.3,36.075 55.475,36.25 R15.2@56.825,36.25
  Int2 w0.75: v1(19.65,7.275) 29.3,7.275 32.8,10.775 32.8,12.975 36.275,16.45 36.275,26.975 42.275,32.975 v1(54.15,32.975)
NetR14_1: R14.1 U6.5 | length 6.6
  Top Layer w0.75: U6.5@67.625,68.595 69.155,68.595 70,67.75 70,65.689 70.439,65.25 R14.1@71.675,65.25
NetR16_1: R16.1 U7.3 U7.6 U21.35 | length 155
  Top Layer w0.75: v1(11.3,92.2) 11.3,90.7 14.7,87.3 16.6,87.3 20.1,83.8 20.1,68.2 26.189,62.111 26.189,61.489 26,61.3 26,58.536 ; R16.1@24.675,59.25 24.675,59.05 24.75,58.975 25.561,58.975 26,58.536 ; U7.6@30.344,55.919 28.475,54.05 26.439,54.05 26,54.489 26,56.75 ; U21.35@31.496,130.048 31.496,135.796 31.5,135.8 v1(31.5,136.1) ; U7.3@33.025,57.95 38.3,57.95 39.5,56.75 39.5,48.75 38.5,47.75 22.689,47.75 22.25,48.189 22.25,55.75 23.25,56.75 26,56.75 ; 26,56.75 26,58.536
  Int2 w0.75: v1(11.3,92.2) 31.5,112.4 v1(31.5,136.1)
NetR21_2: R21.2 U11.1 | length 3.4
  Top Layer w0.75: R21.2@122.875,150.1 122.882,150.107 126.231,150.107 U11.1@126.238,150.114
NetR22_1: R22.1 U11.4 | length 7.8
  Top Layer w0.75: R22.1@130.275,155.6 131.761,155.6 132.2,155.161 132.2,154.6 133.858,152.942 U11.4@133.858,150.114
NetR24_1: R24.1 U8.19 | length 10.1
  Top Layer w1: U8.19@83.3,164.988 83.3,162.8 86.6,159.5 R24.1@86.6,156.275
NetR25_2: R25.2 R26.1 | length 8.5
  Top Layer w0.75: R26.1@60.625,59.75 66.75,59.75 67.626,58.874 68.626,58.874 R25.2@68.71,58.79
NetR28_2: R28.2 R30.2 R31.2 R32.2 R33.2 | length 248.1
  Top Layer w0.75: R28.2@63.575,42 68.5,42 v1(69,41.5) ; v1(119.25,34.5) 119.5,34.25 147.039,34.25 ; R32.2@146.35,10.25 146.35,8.9 147.5,7.75 v1(154,7.75) ; R30.2@146.35,36.583 146.35,34.939 147.039,34.25 ; R33.2@146.35,62.917 146.275,62.917 146.25,62.892 146.25,61.5 147,60.75 v1(151,60.75) ; R31.2@146.35,89.25 146.35,87.439 147.82,85.97 154.53,85.97 v1(156,84.5) ; v1(154.75,34.25) 147.039,34.25
  Int2 w0.75: v1(69,41.5) 69,35.5 70.5,34 103,34 110,27 110,18.25 115.314,12.936 118.186,12.936 119.25,14 v1(119.25,34.5) ; v1(151,60.75) 156,60.75 ; v1(154,7.75) 156,9.75 156,60.75 ; v1(154.75,34.25) 156,34.25 ; v1(156,84.5) 156,60.75
NetR29_1: R29.1 U21.34 | length 173.7
  Top Layer w0.75: v1(33.975,136.375) 33.975,130.109 U21.34@34.036,130.048 ; R29.1@64.675,36.25 64.75,36.325 65.536,36.325 65.975,36.764 65.975,37.286 66.414,37.725 68.3,37.725 70.925,40.35 70.925,44.425 67.937,47.413 66.812,47.413 65.3,48.925 65.3,51.2 66.8,52.7 72.35,52.7 79.475,59.825 90.7,59.825 93.1,62.225 93.1,77.45 89.65,80.9 66.439,80.9 66,81.339 v1(66,92.6)
  Int2 w0.75: v1(33.975,136.375) 33.975,123.511 62.479,95.008 63.592,95.008 v1(66,92.6)
NetR35_1: R35.1 R37.1 | length 17.2
  Top Layer w0.75: R35.1@29.325,84.75 30.5,84.75 v1(31.25,84)
  Int2 w0.75: v1(31.25,84) 31.25,73.25 R37.1@34.25,70.25
NetR48_2: R48.2 R49.1 | length 7.9
  Top Layer w1: R48.2@25.625,10.5 25.625,10.725 25.525,10.825 24.461,10.825 23.875,11.411 23.875,14.839 24.461,15.425 25.525,15.425 25.625,15.525 R49.1@25.625,15.75
NetR62_1: R62.1 U21.18 U25.14 U26.5 | length 113.4
  Top Layer w1: U21.18@61.976,112.268 61.976,107.086 62.562,106.5 69.5,106.5 72.25,103.75 81,103.75 ; U26.5@83.586,108.56 83.548,108.522 83.548,106.298 81,103.75 ; R62.1@97,156.975 97,155.886 97.586,155.3 100.3,155.3 105.57,150.03 ; v1(106.2,136.4) 100.6,130.8 100.6,108.7 95.65,103.75 81,103.75 ; v1(106.2,148.5) 106.2,148.6 105.57,149.23 105.57,150.03 ; U25.14@109.9,150.03 105.57,150.03
  Int1(GND) w1: v1(106.2,136.4) v1(106.2,148.5)
NetR63_1: R63.1 U21.23 U25.15 U26.4 | length 130.6
  Top Layer w0.75: R63.1@101.8,156.975 101.883,156.975 101.958,156.9 101.958,155.942 103.3,154.6 106,154.6 ; v1(105.6,156.3) 106,155.9 106,154.6 ; U25.15@109.9,151.3 115.957,151.3 116.396,151.739 116.396,153.304 115.1,154.6 106,154.6
  Top Layer w1: U21.23@61.976,130.048 61.927,129.999 61.927,127.973 v1(63.7,126.2) ; v1(79.25,112.75) 81.046,110.954 U26.4@81.046,108.56
  Int1(GND) w0.75: v1(79.25,112.75) 81.15,112.75 81.9,113.5 81.9,119.9 86.7,124.7 86.7,130.561 87.139,131 87.4,131 93.1,136.7 100,136.7 103.1,133.6 108.2,133.6 109.9,135.3 109.9,153.1 106.7,156.3 v1(105.6,156.3)
  Int2 w1: v1(63.7,126.2) 66.65,123.25 68.75,123.25 v1(79.25,112.75)
NetR64_1: R64.1 U21.17 U25.13 | length 132.5
  Top Layer w0.75: U21.17@59.436,112.268 59.436,119.436 63.3,123.3 65.2,123.3 66.9,121.6 v1(66.9,119.3) 67.7,119.3 v1(74.7,126.3) ; R64.1@107.1,156.975 107.3,156.975 107.375,156.9 107.375,156.139 107.814,155.7 114.2,155.7 ; U25.13@109.9,148.76 112.76,148.76 112.9,148.9 116.961,148.9 117.4,149.339 117.4,154.8 116.5,155.7 114.2,155.7 ; v1(114.093,158.707) 114.439,158.361 114.439,157.739 114.2,157.5 114.2,155.7
  Int1(GND) w0.75: v1(98.8,133.1) 98.8,131 99.9,129.9 109.7,129.9 116.5,136.7 116.5,156.3 v1(114.093,158.707)
  Int2 w0.75: v1(74.7,126.3) 75,126.6 79.3,126.6 87.6,134.9 97,134.9 v1(98.8,133.1)
NetU11_2: U11.2 U21.7 | length 116.1
  Top Layer w0.75: U21.7@34.036,112.268 34.036,117.036 35.6,118.6 56.1,118.6 62.4,124.9 v1(70.3,124.9) ; v1(104.2,126.1) 104.764,126.1 U11.2@126.238,147.574
  Int2 w0.75: v1(70.3,124.9) 82.1,124.9 89.6,132.4 96.7,132.4 100.2,128.9 100.2,126.7 100.8,126.1 v1(104.2,126.1)
NetU21_10: U21.10 U24.2 | length 49.9
  Top Layer w1: v1(34.5,98.25) 34.5,102 41.656,109.156 U21.10@41.656,112.268
  Int2 w1: U24.2@6.513,92.84 6.614,92.74 7.66,92.74 10.6,89.8 22.05,89.8 30.75,98.5 34.25,98.5 v1(34.5,98.25)
NetU21_19: U21.19 U23.1 | length 32.5
  Top Layer w1: U21.19@64.516,112.268 64.516,120.516 v1(65,121)
  Int2 w1: U23.1@61.75,143 61.746,142.996 61.746,123.854 64.6,121 v1(65,121)
NetU21_20: U21.20 U23.2 | length 34
  Top Layer w1: v1(67,116.25) 67,112.324 U21.20@67.056,112.268
  Int2 w1: U23.2@59.25,143 59.25,124 v1(67,116.25)
NetU21_21: U21.21 U23.3 | length 26.1
  Top Layer w1: U23.3@56.75,143 56.75,144.664 57.336,145.25 64.75,145.25 67.056,142.944 U21.21@67.056,130.048
NetU21_22: U21.22 U23.4 | length 20.3
  Top Layer w1: U23.4@54.25,143 56.25,141 61.5,141 64.516,137.984 U21.22@64.516,130.048
NetU21_27: U21.27 U23.5 | length 13
  Top Layer w1: U23.5@51.75,143 51.783,142.967 51.783,130.081 U21.27@51.816,130.048
NetU21_28: U21.28 U23.6 | length 13
  Top Layer w1: U23.6@49.25,143 49.263,142.987 49.263,130.061 U21.28@49.276,130.048
NetU21_29: U21.29 U23.7 | length 13
  Top Layer w1: U21.29@46.736,130.048 46.743,130.055 46.743,142.993 U23.7@46.75,143
NetU21_30: U21.30 U23.8 | length 13
  Top Layer w1: U21.30@44.196,130.048 44.223,130.075 44.223,142.973 U23.8@44.25,143
NetU25_12: U25.12 U27.1 | length 4.8
  Top Layer w0.75: U25.12@109.9,147.49 109.907,147.482 114.668,147.482 U27.1@114.675,147.475
RS: U8.4 U25.4 | length 47.4
  Top Layer w0.5: U25.4@95.5,148.76 98.14,148.76 104.7,142.2 114.7,142.2 118.8,146.3 118.8,161.4 121.233,163.833 U8.4@121.233,164.995
RST: U8.17 U25.6 | length 48.8
  Top Layer w0.5: U8.17@88.373,164.995 88.373,161.527 89.6,160.3 89.6,154.8 87.4,152.6 87.4,143.5 91.4,139.5 100.907,139.5 101.2,139.793 101.2,143.1 98.08,146.22 U25.6@95.5,146.22
TP1: R60.1 U14.1 U21.5 | length 7.2
  Top Layer w0.75: R60.1@28.956,105.065 U14.1@28.956,108.204 U21.5@28.956,112.268
TP2: R59.1 U17.1 U21.6 | length 7.2
  Top Layer w1: R59.1@31.496,105.065 U17.1@31.496,108.204 U21.6@31.496,112.268
TP3: R58.1 U20.1 U21.15 | length 11.3
  Top Layer w1: U21.15@54.356,112.268 54.491,112.133 54.491,110.509 54.5,110.5 54.5,108.5 55.513,107.487 U20.1@55.513,105.063 55.775,104.801 55.775,103.261 56.361,102.675 R58.1@57.25,102.675
TP4: R57.1 U13.1 U21.16 | length 12.4
  Top Layer w1: U21.16@56.896,112.268 56.896,107.604 57.5,107 58.164,107 58.75,106.414 U13.1@58.75,105 59.012,104.738 59.012,103.574 59.336,103.25 60.075,103.25 60.9,102.425 R57.1@61,102.425
TP5: R56.1 U16.1 U21.24 | length 7.7
  Top Layer w1: U21.24@59.436,130.048 U16.1@59.436,133.604 R56.1@59.436,137.759
TP6: R55.1 U19.1 U21.26 | length 7.7
  Top Layer w1: U21.26@54.356,130.048 U19.1@54.356,133.604 R55.1@54.356,137.759
TP7: R54.1 U12.1 U21.37 | length 8.2
  Top Layer w1: U21.37@26.416,130.048 U12.1@26.416,133.604 R54.1@26.416,138.267
TP8: R53.1 U15.1 U21.36 | length 8.2
  Top Layer w1: U21.36@28.956,130.048 U15.1@28.956,133.604 R53.1@28.956,138.267
TP9: R52.1 U18.1 U21.33 | length 8.2
  Top Layer w1: U21.33@36.576,130.048 U18.1@36.576,133.604 R52.1@36.576,138.267
pads on no net: 4.3 4.4 U3.5 U4.4 U4.5 U5.1 U5.6 U6.1 U6.3 U6.7 U6.8 U8.3 U8.16 U8.18 U26.6

## Polygon pours and split planes (outlines as drawn)
GND on Int1(GND) "GND_L02_P000" (solid, pour order 0): 0,170 0,0 170,0 170,170
+5 on Bottom Layer(PWR) "+5_L04_P003" (solid, pour order 3): 58.7,166.3 58.7,161.25 86.25,161.25 130.25,161.25 130.25,166.3
+12 on Bottom Layer(PWR) "+12_L04_P004" (solid, pour order 4): 160.4,168.3 151.3,168.3 151.3,157.6 160.4,157.6
+5 on Bottom Layer(PWR) "+5_L04_P005" (solid, pour order 5): 1.7,135.4 1.7,10.2 100.6,10.2 100.6,135.3 100.5,135.4
GND on Int2 "GND_L03_P002" (solid, pour order 2): 2.75,162.5 10,162.5 10,168.25 74.25,168.25 167.75,168.25 167.75,145 23.75,145 23.75,140 2.75,140

## Keep-outs
Keep-Out Layer:
  lines w1: 0,0 170,0 170,170 0,170 0,0
  lines w1.2: 0,0 170,0 170,170 0,170 0,0

## Silkscreen, mask and mechanical layers (free items; w line width, h text height)
Top Overlay:
  drawing of 31 lines, arcs and shapes, not listed
  text "4.097V Ref" at 75.254,80.504 h1.52
  text "Naiflab.com" at 25.3,2.656 h5
  text "35W Electronic DC Load" at 75,2.66 h5
Mechanical 13:
  the board outline again, w1.2